# EAGLE board mixed_tht_keepout (EAGLE 6.6.0)
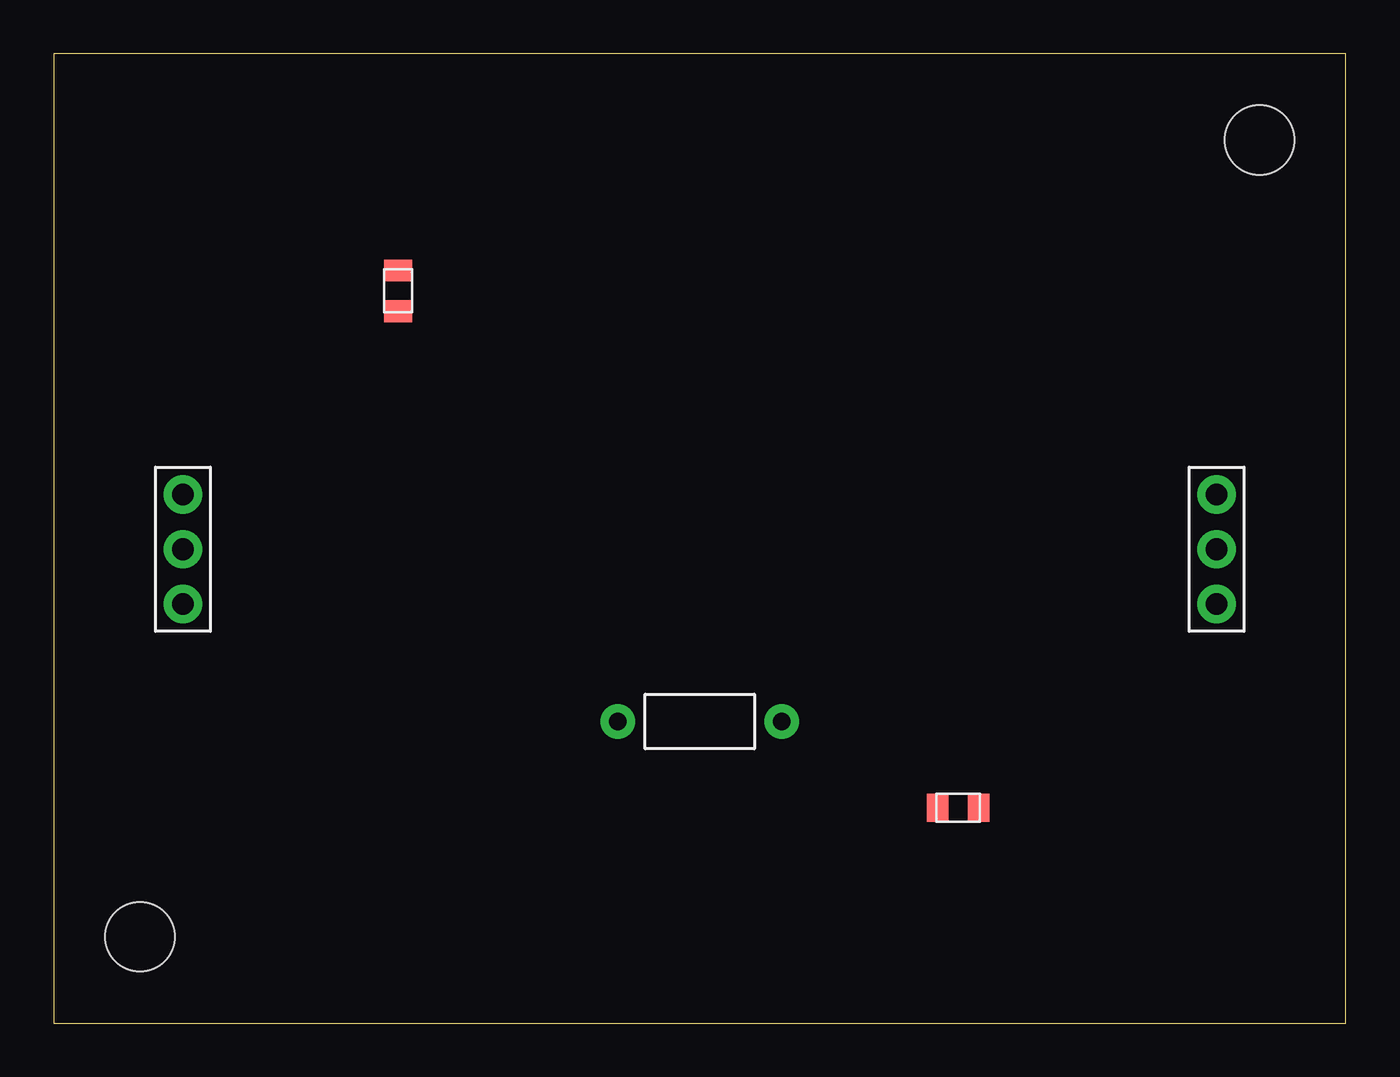
[diagram p0: board, top side]
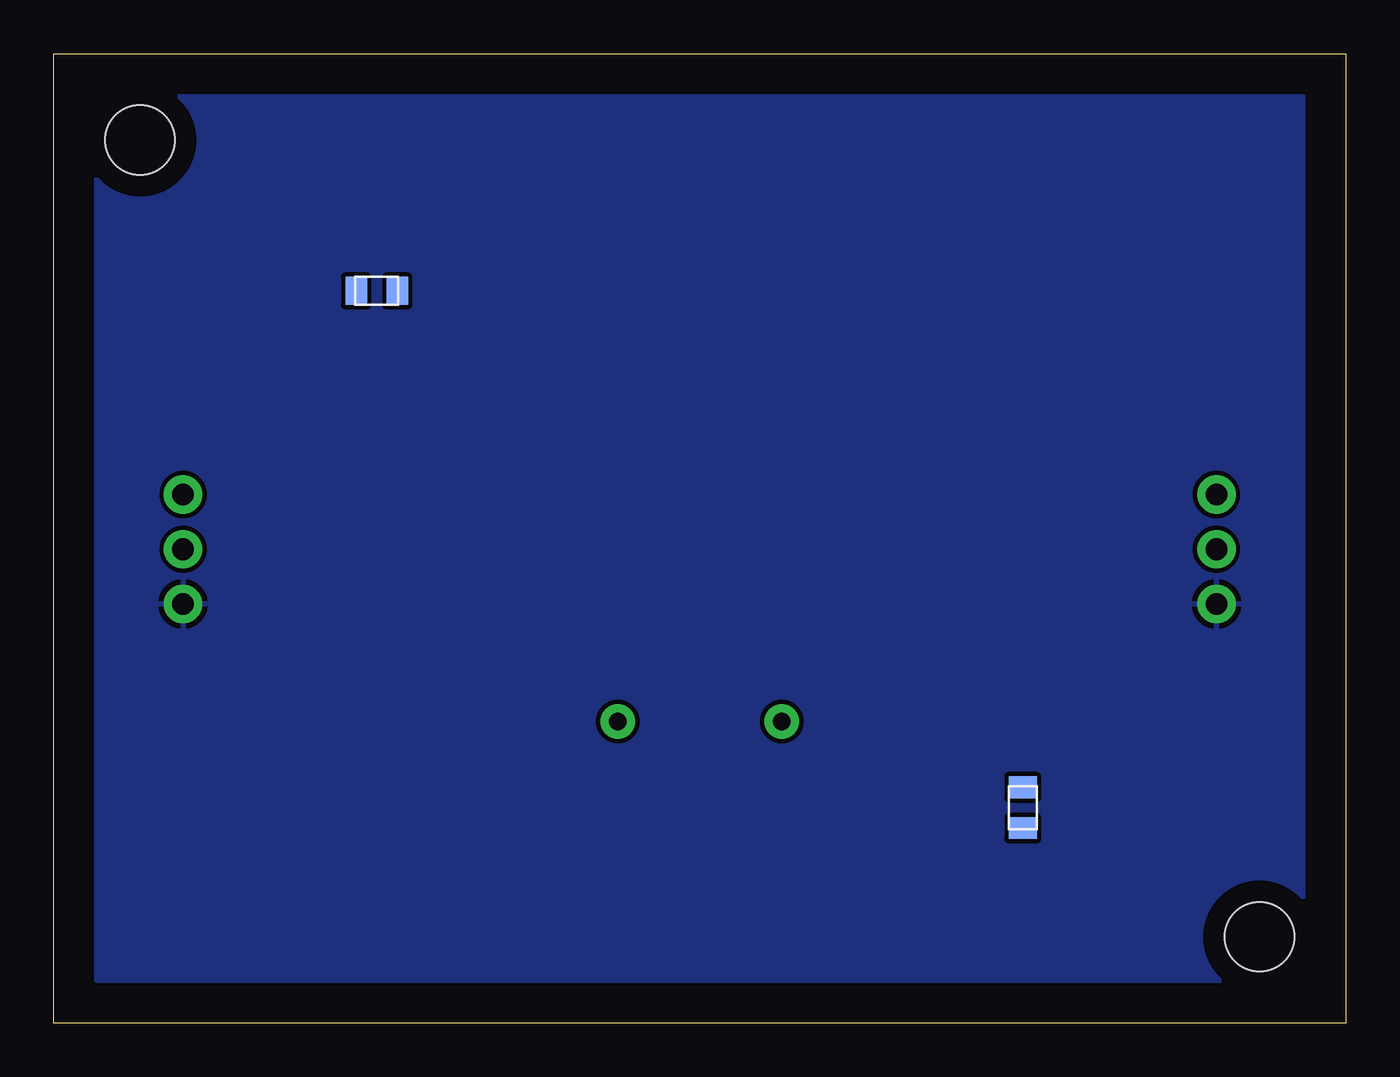
[diagram p1: board, bottom side, seen from below]

Size 60 x 45 mm. Coordinates in mm from the lower left corner, seen from the top.
Outline: 0,0 60,0 60,45 0,45 0,0
Copper layers (1*16): Top / Bottom
Design rules "default": minimum track width 10mil, minimum drill 24mil, track to track 8mil, track to pad 8mil, pad to pad 8mil, via to via 8mil, copper to edge 40mil
Holes 3.2 mm at 4,4 56,41
tKeepout: area 24,28 to 36,38

## Footprints (pad centres in the part's own frame; a part is rotated, then mirrored left to right if it is on the bottom)
R0805 = smd 1 x 1.3: 1 -0.95,0; 2 0.95,0
HDR-1X3 = drill 1 pad 1.778: 1 0,2.54; 2 0,0; 3 0,-2.54
AXIAL-THT = drill 0.8 pad 1.6: 1 -3.81,0; 2 3.81,0

## Placement (x,y rotation side)
C1  1uF  [R0805]  42,10 180 top
C2  100nF  [R0805]  16,34 90 top
J1  PWR_IN  [HDR-1X3]  6,22 0 top
J2  SIG_OUT  [HDR-1X3]  54,22 0 top
L1  10uH  [AXIAL-THT]  30,14 180 top
R1  4.7k  [R0805]  45,34 0 bottom
R2  4.7k  [R0805]  15,10 90 bottom

## Library data of the parts
C1 C2 J1 J2 L1 R1 R2 = synthetic

## Nets
GND: C1.2 C2.2 J1.3 J2.3
SIG1: C1.1 J1.1 L1.1
SIG2: C2.1 L1.2 R1.1
SIG3: J2.1 R1.2 R2.1
SIG4: J2.2 R2.2

## Tracks (layer width: path | path; a pad name or v marks a point on that pad's centre or on a via)
GND
  pour Bottom: 2,2 58,2 58,43 2,43